# Altium PCB OFP_MCM_v1.6.PcbDoc (part 8 of 8)
Units mm, origin at the board's own origin, x right, y up, seen from the top; angles counter-clockwise.
Board outline 110 x 120 mm, 4 copper layers (Top Layer, Layer 1, Layer 2, Bottom Layer), stack 1.576 mm thick; 381 components, 285 nets, 1332 pads, 552 vias.
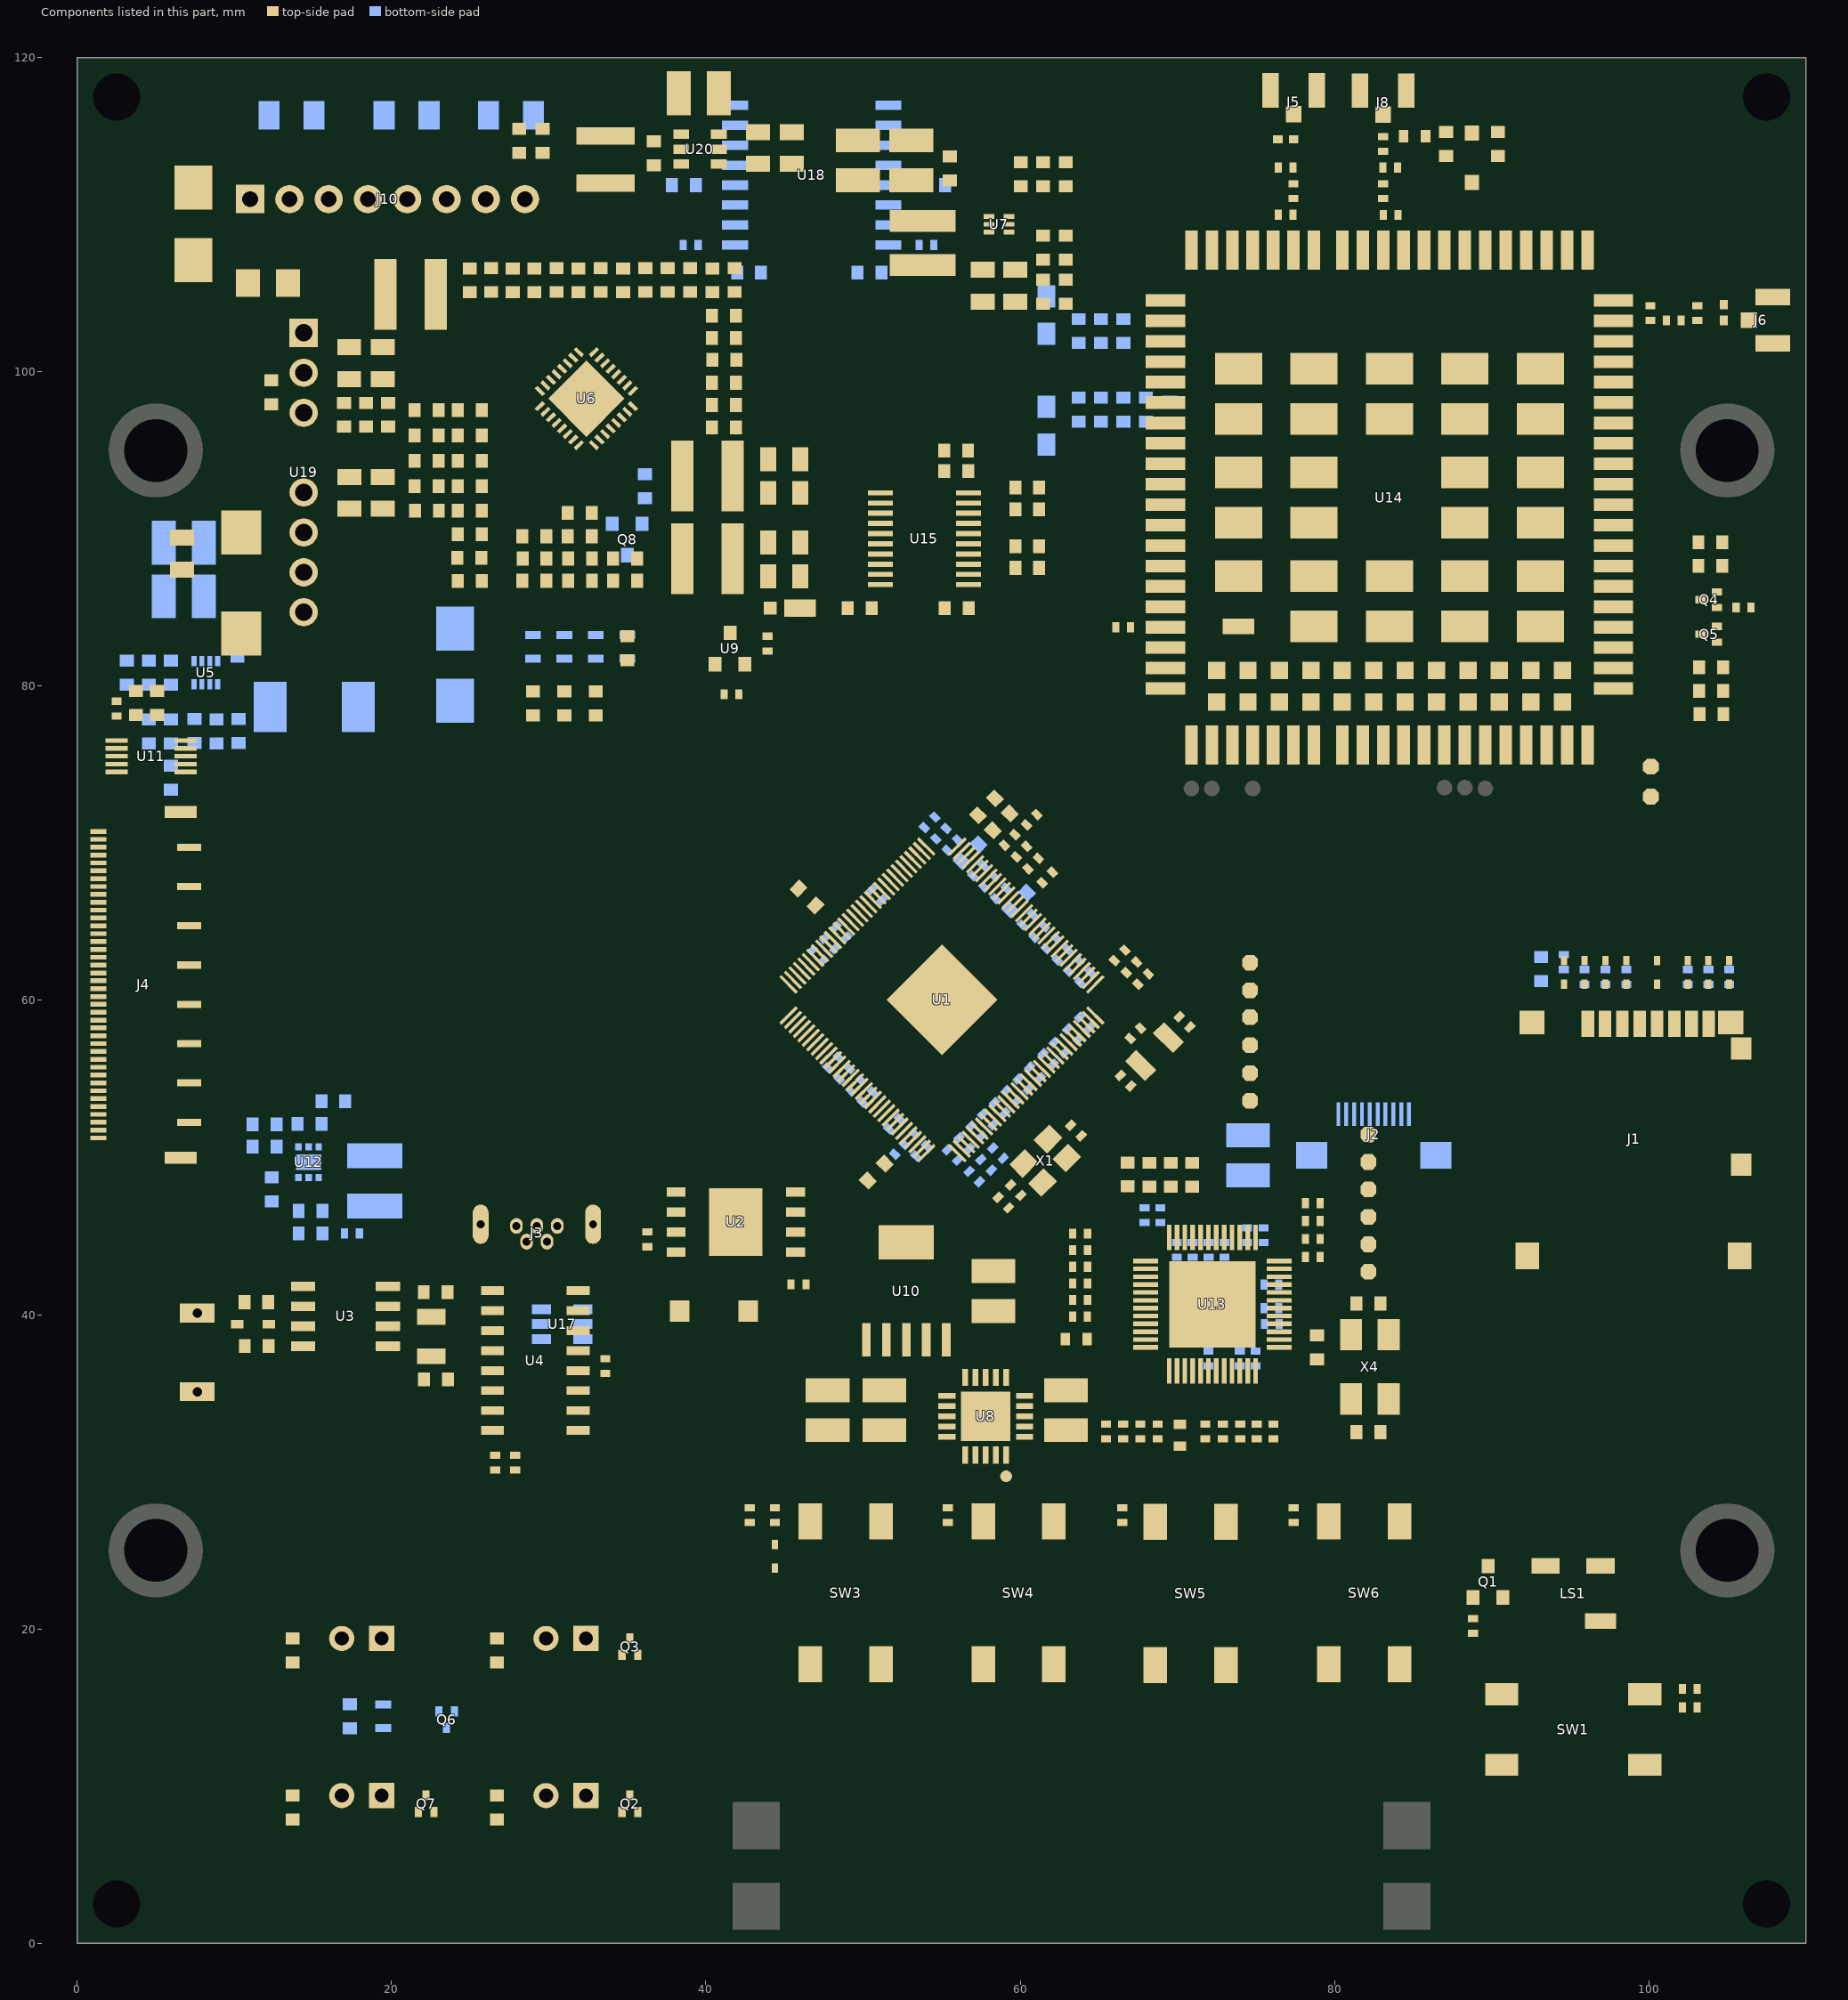
[diagram p7: the components of this part, seen from the top]

## Polygon pours and split planes (outlines as drawn)
+3.8V on Top Layer "NONET_L-01_P-001" (solid, pour order 37): 56.353,105.487 56.717,105.123 63.548,105.123 63.906,104.765 63.906,102.697 64.253,102.35 70.694,102.35 71.092,101.952 71.092,98.05 70.692,97.65 51.699,97.65 51.699,107.506 56.353,107.506
GND on Top Layer "NONET_L-01_P-001" (solid, remove dead copper, pour order 45): 0,120 110,120 110,0 0,0 0,120
VCC-DRAM on Top Layer "NONET_L-01_P-001" (solid, pour order 19): 57.035,56.251 58.096,56.251 59.833,54.514 60.571,53.776 58.449,51.655 57.389,52.715 56.532,52.715 ccw(c56.532,50.175) 54.736,51.971 51.612,48.848 50.622,49.838
+5V on Top Layer "NONET_L-01_P-001" (solid, pour order 4): 33.581,96.533 35.508,94.606 35.599,94.606 35.786,94.793 35.786,95.536 34.185,97.137
GND on Layer 1 "NONET_L-01_P-001" (solid, pour order 36): 0,120 110,120 110,0 0,0 0,120
+3.3V on Layer 2 "NONET_L-01_P-001" (solid, pour order 32): 25.654,6.58 ccw(c26.646,6.58) 26.646,5.588 ccw(c26.646,6.58) 27.639,6.58 27.639,26.27 88.628,26.27 91.77,29.382 91.77,68.292 109.498,68.292 109.498,0 0,0 0,92.091 58.535,92.091 59.487,91.139 59.487,82.674 58.423,81.61 38.608,81.61 37.846,80.848 37.846,50.614 40.15,48.311 47.29,48.311 47.574,48.026 47.574,45.801 47.31,45.537 37.902,45.537 34.078,49.361 34.078,77.758 33.195,78.641 28.857,78.641 27.813,77.598 27.813,63.632 18.398,54.217 18.398,33.099 25.654,25.842
+5V on Layer 2 "NONET_L-01_P-001" (solid, pour order 13): 81.976,49.718 82.405,49.718 83.439,48.683 83.439,31.242 82.55,30.353 51.943,30.353 51.211,31.085 51.211,39.128 50.588,39.751 45.466,39.751 44.958,39.243 44.958,27.184 88.017,27.184 90.691,29.858 90.691,68.292 70.5,88.482 70.5,119.634 0.381,119.634 0.381,92.784 11.437,92.784 14.363,95.711 14.363,108.099 14.005,108.458 9.779,108.458 9.144,109.093 9.144,112.004 9.789,112.649 58.801,112.649 60.198,111.252 60.198,75.026 71.374,63.85 71.374,50.458 72.114,49.718
GND on Layer 2 "NONET_L-01_P-001" (solid, pour order 52): 53.742,77.082 cw(c53.742,76.51) 54.313,76.51 54.313,71.309 49.116,66.112 48.315,66.112 47.054,67.373 46.003,67.373 42.316,63.687 42.316,59.913 48.376,53.853 47.361,52.838 50.147,50.052 51.073,50.052 51.429,49.695 51.429,47.986 52.145,47.271 59.517,47.271 61.257,49.011 63.486,49.011 63.906,48.59 63.899,48.583 63.899,34.994 63.365,34.459 60.138,34.459 59.733,34.055 59.733,31.613 59.108,30.988 52.422,30.988 51.852,31.558 51.852,39.715 51.105,40.462 45.14,40.462 44.044,39.366 44.044,28.956 28.575,28.956 22.633,34.898 22.633,52.361 29.809,59.538 31.775,59.538 31.775,48.771 36.985,43.561 58.518,43.561 ccw(c58.518,44.373) 59.329,44.373 59.329,44.619 ccw(c58.411,44.619) 58.411,45.537 48.402,45.537 48.1,45.839 48.1,48.143 47.343,48.9 40.884,48.9 38.718,51.067 38.718,76.557 39.243,77.082
VCC-IO on Layer 2 "NONET_L-01_P-001" (solid, pour order 43): 58.248,63.493 60.34,65.584 60.771,65.584 63.883,62.471 63.883,62.078 55.86,54.055 55.86,51.487 54.869,50.496 50.362,50.496 48.159,52.698 48.159,52.89 48.784,53.515 48.969,53.515 50.757,51.727 54.313,51.727 54.643,52.057 54.643,54.928 62.141,62.425 62.141,62.782 61.349,63.574 60.757,63.574 57.59,60.406 57.012,60.406 50.984,66.434 50.984,67.227 55.852,72.095 55.984,72.095 57.406,70.673 57.406,70.322 54.313,67.229 54.313,66.883 57.704,63.493
GND on Layer 2 "NONET_L-01_P-001" (solid, pour order 50): 110,120 71.679,120 71.679,88.82 91.303,69.195 110,69.195
GND on Layer 2 "NONET_L-01_P-001" (solid, pour order 51): 59.487,93.683 58.588,92.784 38.22,92.784 37.552,93.452 37.552,109.336 36.788,110.1 27.604,110.1 27.604,111.989 58.344,111.989 59.487,110.845
+1.2V on Layer 2 "NONET_L-01_P-001" (solid, pour order 49): 16.9,108.718 17.402,109.22 36.214,109.22 36.816,108.618 36.816,102.682 36.215,102.081 17.407,102.081 16.9,102.588
VDD-SYS on Layer 2 "NONET_L-01_P-001" (solid, pour order 48): 52.263,50.038 51.953,49.728 51.953,48.08 52.282,47.752 59.208,47.752 59.841,48.385 59.841,52.873 62.112,55.143 62.112,55.595 60.216,57.491 59.842,57.491 56.284,53.934 56.284,51.311 55.011,50.038
AVCC on Layer 2 "NONET_L-01_P-001" (solid, pour order 47): 62.895,54.894 62.895,55.414 60.672,57.637 60.672,58.049 64.275,61.652 64.275,62.636 63.26,63.651 60.922,65.989 60.196,65.989 58.088,63.881 57.865,63.881 57.485,64.261 57.485,64.469 60.762,67.747 61.412,67.747 66.953,62.206 66.953,59.778 66.953,53.291 63.17,49.508 62.435,49.508 60.235,51.709 60.235,52.234
VDD-SYS on Layer 2 "NONET_L-01_P-001" (solid, pour order 44): 46.129,62.371 49.934,66.177 50.629,66.177 56.713,60.092 57.856,60.092 60.918,63.154 61.217,63.154 61.655,62.716 61.655,62.506 54.243,55.093 54.243,53.002 54.101,52.861 53.515,52.861 53.377,52.999 53.377,54.428 46.129,61.676
VCC-HP on Layer 2 "NONET_L-01_P-001" (solid, pour order 46): 67.35,60.129 67.35,53.747 67.838,53.258 69.923,53.258 70.425,53.76 70.425,63.403 62.343,71.485 61.485,71.485 56.116,66.116 56.116,65.625 56.85,64.891 57.331,64.891 60.602,68.161 61.553,68.161 67.35,62.365
VDD-CPU on Layer 2 "NONET_L-01_P-001" (solid, pour order 42): 46.811,66.964 48.26,65.515 48.26,65.118 45.7,62.558 45.7,61.475 51.816,55.359 51.816,54.846 50.215,53.245 49.817,53.245 42.863,60.199 42.863,63.518 46.308,66.964
+5V on Layer 2 "NONET_L-01_P-001" (solid, pour order 27): 10.668,108.107 11.019,108.458 14.005,108.458 14.4,108.063 14.4,101.721 14.775,101.346 36.216,101.346 36.816,100.747 36.816,93.406 36.194,92.784 11.437,92.784 10.668,93.553
VDD33 on Layer 2 "NONET_L-01_P-001" (solid, pour order 33): 64.389,48.611 64.75,48.971 82.063,48.971 82.639,48.395 82.639,31.839 81.788,30.988 68.04,30.988 67.386,31.642 67.386,35.765 66.956,36.195 64.833,36.195 64.389,36.639 64.389,38.5 64.805,38.917 72.562,38.917 73.22,38.259 73.22,33.49 73.599,33.111 75.418,33.111 75.828,33.521 75.828,37.082 76.203,37.456 78.953,37.456 79.429,37.932 79.429,42.982 79.033,43.378 77.569,43.378 77.137,43.81 77.137,45.329 76.543,45.923 67.502,45.923 67.061,45.481 67.061,44.168 66.625,43.733 64.662,43.733 64.389,44.006
VDD11 on Layer 2 "NONET_L-01_P-001" (solid, pour order 41): 64.389,43.02 64.684,43.332 66.782,43.332 67.455,44.005 67.455,45.319 67.66,45.525 76.37,45.525 76.74,45.155 76.74,43.458 77.216,42.982 78.782,42.982 79.036,42.729 79.036,38.088 78.796,37.849 76.045,37.849 75.439,37.243 75.439,33.694 75.247,33.502 73.788,33.502 73.609,33.681 73.609,38.424 72.621,39.412 64.749,39.412 64.389,39.772
NetL6_2 on Bottom Layer "NONET_L-01_P-001" (solid, pour order 38): 20.676,49.223 15.869,49.223 15.869,50.464 15.177,50.464 15.177,51.23 20.676,51.23
+3.3V on Bottom Layer "NONET_L-01_P-001" (solid, pour order 53): 47.698,56.105 46.523,54.929 ccw(c48.098,53.354) 45.87,53.354 45.87,41.81 ccw(c46.66,41.81) 46.66,41.021 50.564,41.021 ccw(c50.564,42.198) 51.741,42.198 51.741,49.493 ccw(c51.182,49.493) 51.182,50.052 50.574,50.052 ccw(c50.574,49.414) 49.936,49.414 49.936,47.557 cw(c49.371,47.557) 49.371,46.991 47.704,46.991 cw(c47.704,47.628) 47.066,47.628 47.066,52.777 cw(c47.911,52.777) 47.314,53.374 48.871,54.932
GND on Bottom Layer "NONET_L-01_P-001" (solid, remove dead copper, pour order 5): 0,120 110,120 110,0 0,0 0,120
+5V on Bottom Layer "NONET_L-01_P-001" (solid, pour order 40): 70.189,50.504 69.875,50.818 69.875,53.916 70.112,54.153 80.099,54.153 80.374,53.878 80.374,51.756 80.083,51.464 76.804,51.464 75.844,50.504

## Other copper
Top Layer:
  rectangle net +5VUSB: 25.693,30.834 28.397,33.036
  rectangle net GND: 6.358,69.522 7.882,70.195
  rectangle net GND: 6.358,66.838 7.882,67.479
  rectangle net GND: 6.358,54.369 7.882,54.979
  rectangle net GND: 6.358,57.021 7.882,57.699
  region net +3.3V: 11.018,39.134 11.018,39.654 9.783,39.654 9.783,39.134
  rectangle net 3V3-I: 40.054,111.456 46.539,113.523
  rectangle net 3V3-I: 41.995,111.456 46.539,114.249
  rectangle net 3V3-I: 31.765,111.456 46.228,112.556
  rectangle net GND-IN: 37.514,114.823 39.038,119.126
  rectangle net NetC151_2: 31.765,113.873 37.141,115.556
  rectangle net NetC151_1: 36.404,112.776 38.924,113.538
  rectangle net NetC151_2: 31.765,113.873 38.924,114.473
  rectangle net 3V3-I: 40.054,112.923 45.466,113.523
  rectangle net VIN+: 40.054,113.873 41.578,117.729
  rectangle net GND: 40.182,79.167 41.391,81.861
  rectangle net VLED-: 0.837,50.317 3.618,51.402
  rectangle net VLED-: 0.837,50.317 1.853,51.402
  rectangle net GND: 40.215,41.415 43.615,48.05
  rectangle net GND: 71.461,31.879 72.143,32.336
  region net GND: 33.751,95.712 33.927,95.889 32.554,97.262 32.378,97.085
  region net GND: 34.811,96.773 34.988,96.949 33.615,98.322 33.438,98.146
  region net GND: 34.281,100.358 34.104,100.535 32.731,99.162 32.908,98.985
  region net GND: 31.049,100.888 30.873,100.711 32.245,99.338 32.422,99.515
  rectangle net NetR63_2: 58.952,109.741 61.9,112.19
  rectangle net 1.1V-HUB: 61.519,31.892 64.313,33.924
  rectangle net +3.3V: 41.132,82.941 44.249,83.861
  rectangle net +3.0V: 41.873,78.138 42.902,81.861
  rectangle net +3.8V: 68,97.65 70.5,102.35
  region net USB-D_N: 61.172,64.63 62.197,65.655 62.056,65.797 61.03,64.771
  region net USB-D_P: 60.889,64.913 61.914,65.938 61.773,66.079 60.747,65.054
  rectangle net 1.1V-HUB: 58.926,35.464 60.82,36.551
  rectangle net 1.1V-HUB: 61.519,31.892 65.777,32.336
  rectangle net 1.1V-HUB: 59.733,33.33 64.313,33.924
  rectangle net 1.1V-HUB: 59.733,33.357 60.82,36.551
  rectangle net +3.8V: 51.699,103.963 63.341,105.123
  rectangle net +3.8V: 51.699,103.963 56.353,107.506
  rectangle net NetR58_1: 58.952,108.282 61.9,109.041
  region net VCC-DRAM: 59.098,55.273 58.93,55.105 60.414,53.62 60.583,53.788
  region net VCC-DRAM: 57.098,53.313 56.93,53.144 58.434,51.64 58.603,51.808
  region net AGND: 59.806,66.634 59.638,66.802 58.788,65.952 58.956,65.784
  region net AGND: 62.193,67.692 63.196,68.695 60.281,71.61 59.279,70.607
  region net VDD-CPU: 45.85,63.688 47.419,62.12 47.844,62.544 46.275,64.113
  region net VDD-CPU: 47.608,64.759 48.249,65.4 47.254,66.395 46.613,65.754
  region net VDD-CPU: 46.38,65.987 48.833,63.534 49.258,63.958 46.804,66.412
  region net VCC-DRAM: 51.612,48.848 54.066,51.301 53.076,52.291 50.622,49.838
  region net VCC-DRAM: 58.025,51.231 56.964,52.291 55.328,50.655 56.388,49.594
  region net VCC-DRAM: 57.848,51.383 57.526,51.705 55.422,49.601 55.744,49.279
  rectangle net VDD11: 71.461,32.819 72.143,33.276
  rectangle net NetR110_2: 102.833,77.787 103.607,80.145
  rectangle net EC_RST: 102.833,80.756 103.624,84.085
  rectangle net EC_PWR: 102.781,84.722 103.624,89.601
  rectangle net VDD33: 75.682,43.267 78.372,43.567
  rectangle net +5V: 57.415,109.741 58.602,110.293
  region net +5V: 34.185,97.137 33.581,96.533 35.153,94.961 35.757,95.565
  region net NetC65_2: 33.125,96.076 32.86,95.812 34.523,94.149 34.788,94.413
  region net NetC72_2: 34.892,97.844 34.628,97.58 36.289,95.918 36.554,96.182
  region net NetC54_2: 31.721,100.57 31.898,100.747 30.525,102.12 30.348,101.943
  region net +3.3V: 2.118,78.549 ccw(c2.118,78.232) 1.801,78.232 1.801,76.395 5.166,76.395 ccw(c5.166,76.746) 5.518,76.746 5.518,78.549
  region net 12V: 14.406,90.685 cw(c14.406,89.785) 15.306,89.785 cw(c14.406,89.785) 14.406,88.885 5.912,88.885 5.912,90.685
  region net VIN+: 14.4,111.9 14.4,108.853 cw(c14.005,108.853) 14.005,108.458 11.9,108.458 11.9,101.575 ccw(c12.644,101.574) 12.644,100.83 14.406,100.83 cw(c14.395,99.919) 15.306,99.945 cw(c14.406,99.945) 14.406,99.045 4.928,99.045 4.928,107.315 cw(c6.137,107.315) 6.137,108.525 9.155,108.525 ccw(c9.155,109.474) 10.104,109.474 10.104,111.9
  region net +EXT: 104.191,81.645 ccw(c104.191,81.477) 104.024,81.477 104.024,79.496 ccw(c104.264,79.496) 104.264,79.255 105.437,79.255 cw(c105.437,78.712) 105.98,78.712 105.98,78.676 106.487,78.676 106.487,81.071 ccw(c105.913,81.071) 105.913,81.645
  region net 3.3V-HUB: 53.381,36.643 ccw(c53.381,37.008) 53.746,37.008 53.746,40.589 53.746,40.629 53.762,40.708 53.793,40.782 53.837,40.848 53.894,40.905 53.96,40.949 54.034,40.98 54.113,40.996 54.153,40.996 59.868,40.996 59.898,40.996 59.955,40.984 60.008,40.962 60.057,40.93 60.098,40.889 60.13,40.84 60.152,40.787 60.164,40.73 60.164,40.701 60.164,39.343 60.165,39.315 60.176,39.259 60.198,39.207 60.229,39.16 60.269,39.12 60.316,39.089 60.368,39.067 60.424,39.056 60.452,39.055 62.964,39.055 62.984,39.055 63.023,39.047 63.061,39.031 63.094,39.009 63.123,38.98 63.145,38.947 63.161,38.91 63.168,38.87 63.168,38.85 63.168,37.541 63.168,37.52 63.16,37.479 63.144,37.44 63.121,37.406 63.091,37.376 63.056,37.353 63.018,37.337 62.977,37.329 62.956,37.329 56.976,37.329 56.948,37.327 56.893,37.316 56.841,37.295 56.795,37.264 56.755,37.224 56.724,37.177 56.702,37.126 56.692,37.071 56.69,37.043 56.69,35.464 56.233,35.464 56.199,35.462 56.131,35.449 56.068,35.422 56.011,35.384 55.995,35.368 55.979,35.368 55.979,35.352 55.962,35.336 55.924,35.279 55.898,35.215 55.885,35.148 55.883,35.114 55.883,33.357 54.559,33.357 54.539,33.356 54.5,33.348 54.463,33.333 54.43,33.311 54.402,33.282 54.38,33.249 54.365,33.213 54.357,33.173 54.356,33.154 54.356,32.654 54.357,32.631 54.366,32.586 54.384,32.544 54.409,32.506 54.441,32.474 54.479,32.448 54.521,32.431 54.566,32.422 54.589,32.421 55.883,32.421 55.883,31.892 55.884,31.864 55.895,31.811 55.916,31.761 55.946,31.715 55.985,31.677 56.03,31.646 56.08,31.626 56.134,31.615 56.161,31.614 56.69,31.614 56.69,30.527 53.416,30.527 53.384,30.527 53.32,30.539 53.26,30.564 53.206,30.6 53.16,30.646 53.124,30.7 53.099,30.761 53.086,30.824 53.086,30.857 53.086,34.007 53.084,34.048 53.068,34.13 53.036,34.207 52.99,34.276 52.931,34.335 52.861,34.382 52.784,34.413 52.703,34.43 52.661,34.432 49.962,34.432 49.962,36.643
  pour cut-out: 67.746,93.078 67.746,93.332 55.757,93.332 55.757,93.078
  pour cut-out: 16.554,92.041 16.554,90.685 0.388,90.685 0.388,99.09 15.39,99.09 15.39,100.876 16.554,100.876
  pour cut-out: 21.514,100.806 21.514,108.203 15.558,108.203 15.558,100.806
  pour cut-out: 9.175,54.191 9.417,54.191 9.417,67.75 9.175,67.75
  pour cut-out: 24.207,43.237 24.207,36.321 23.217,36.321 23.217,34.616 18.741,34.616 18.741,41.275 20.545,41.275 20.545,43.237
  pour cut-out: 6.286,37.303 15.399,37.303 15.399,40.35 6.286,40.35
  pour cut-out: 30.888,33.346 32.858,33.346 32.858,42.058 30.888,42.058
  pour cut-out: 25.439,33.346 27.408,33.346 27.408,42.058 25.439,42.058
  pour cut-out: 35.388,44.782 37.261,44.782 37.261,44.853 35.388,44.853
  pour cut-out: 47.744,111.428 48.278,111.428 48.278,119.612 47.744,119.612
  pour cut-out: 24.658,94.911 24.851,94.911 24.851,95.369 24.658,95.369
  region net GND-IN: 117 vertices and 6 holes, not listed, extent 0.388,99.045 46.539,119.612
  region net GND-IN: 12.816,108.187 15.248,108.187 15.287,108.183 15.306,108.013 15.306,100.91 15.142,100.842 15.115,100.869 14.852,101.021 14.558,101.099 14.255,101.099 14.216,101.089 12.651,101.089 12.603,101.091 12.504,101.111 12.416,101.147 12.337,101.2 12.27,101.267 12.217,101.346 12.181,101.434 12.161,101.533 12.159,101.581 12.159,107.461 12.169,107.54 12.165,107.546 12.213,107.79 12.355,108.002 12.566,108.143 12.798,108.189
  region net +5V: 62.951,117.087 62.981,117.067 63.314,116.733 63.334,116.703 63.341,116.668 63.341,112.99 63.335,112.957 63.328,112.952 62.452,112.952 62.452,114.693 62.149,114.996 58.962,114.996 58.696,114.73 58.696,112.206 58.693,112.19 58.693,109.741 58.6,109.741 57.307,109.741 57.307,111.428 51.275,111.428 51.133,111.428 48.278,111.428 48.278,112.952 54.388,112.952 54.477,112.952 56.436,112.952 56.436,113.254 56.436,116.551 56.443,116.586 56.463,116.616 56.914,117.067 56.944,117.087 56.979,117.094 62.915,117.094
  region net +1.2V: 20.454,107.4 20.454,101.065 16.554,101.065 16.554,107.4
  region net +5V: 16.533,92.3 16.533,96.89 20.739,96.89 20.739,100.989 22.31,100.989 22.316,100.988 30.242,100.988 31.191,100.04 30.663,99.512 29.989,100.187 29.763,100.413 26.485,100.413 26.379,100.306 24.487,98.414 22.154,98.414 22.154,90.73 21.108,90.73 21.108,92.027 20.834,92.3
  pour cut-out: 44.395,108.204 27.044,108.204 27.044,105.433 44.395,105.433
  pour cut-out: 48.278,111.428 47.744,111.428 47.744,108.204 44.399,108.204 44.399,107.506 48.278,107.506
  pour cut-out: 99.262,81.804 99.262,83.096 98.986,83.096 98.986,81.804
  pour cut-out: 66.234,32.473 76.685,32.473 76.685,32.817 66.234,32.817
  pour cut-out: 82.915,51.841 82.792,51.841 82.792,44.101 82.915,44.101
  pour cut-out: 82.411,37.098 82.548,37.098 82.548,41.969 82.411,41.969
  pour cut-out: 21.986,92.184 21.986,92.019 22.444,92.019 22.444,92.184
  pour cut-out: 70.347,48.774 70.347,51.564 70.248,51.564 70.248,48.774
  pour cut-out: 94.144,59.345 94.144,61.578 96.566,61.578 96.566,65.131 104.452,65.131 104.452,59.345
  region net +5V: 52.008,39.439 52.081,39.365 52.121,39.27 52.121,39.218 52.121,37.368 52.121,37.296 52.066,37.164 51.965,37.063 51.832,37.008 49.672,37.008 49.619,37.003 49.522,36.962 49.448,36.888 49.408,36.791 49.403,36.739 49.403,34.686 49.403,34.635 49.364,34.542 49.293,34.47 49.2,34.432 46.359,34.432 46.206,34.495 46.088,34.613 46.025,34.766 46.025,34.849 46.025,39.041 46.025,39.128 46.091,39.289 46.214,39.412 46.375,39.479 51.912,39.479
  region net NetC54_2: 24.276,107.4 24.276,105.444 25.421,105.444 25.428,105.437 25.428,102.632 30.013,102.632 31.223,101.421 31.221,101.418 31.895,100.744 31.727,100.576 31.233,101.071 31.211,101.085 31.049,101.247 31.047,101.244 31.041,101.25 30.707,100.917 30.377,101.247 21.514,101.247 21.514,107.4
  region net +3.3V: 44.494,90.855 44.494,83.179 44.13,82.814 41,82.814 41,90.855
  region net +1.8V: 44.475,95.193 44.475,91.134 41,91.134 41,95.634 44.034,95.634
  region net NetC65_2: 33.567,95.529 33.589,95.515 33.751,95.353 33.799,95.401 33.803,95.398 34.073,95.668 35.774,93.968 35.774,91.601 36.519,90.855 39.2,90.855 39.2,85.51 39.034,85.344 33.797,85.344 33.595,85.546 33.595,87.022 33.722,87.149 34.713,87.149 34.865,86.998 34.865,86.006 34.981,85.89 36.153,85.89 36.262,85.999 36.262,86.006 36.262,87.403 36.262,88.842 36.008,89.096 34.865,89.096 34.463,89.499 34.463,94.293 33.577,95.179 33.579,95.182 32.905,95.856 33.072,96.024
  region net NetC72_2: 35.518,97.121 35.521,97.123 35.73,96.914 38.882,96.914 38.885,96.917 40.892,96.917 40.892,96.028 39.37,96.028 39.184,95.858 39.184,91.134 36.643,91.134 36.043,91.734 36.043,96.248 35.344,96.947 35.347,96.949 35.185,97.111 35.171,97.133 34.676,97.628 34.844,97.795
Layer 1:
  pour cut-out: 15.917,95.104 12.884,95.104 12.884,104.595 15.917,104.595
  pour cut-out: 9.249,109.489 9.249,112.522 29.972,112.522 29.972,109.489
Bottom Layer:
  rectangle net +5V: 13.582,43.485 20.17,44.425
  region net 12V: 8.276,83.995 8.276,81.257 8.596,81.257 8.596,83.995
  rectangle net NetR82_1: 15.157,51.688 15.919,54.025
  rectangle net +5V: 17.729,43.485 20.168,47.714
  rectangle net NetL6_2: 15.995,49.314 20.168,50.914
  rectangle net NetL6_2: 15.177,50.464 20.168,50.914
  rectangle net GND: 15.614,44.859 17.247,45.494
  region net NetR82_1: 15.995,46.162 15.995,48.964 15.106,48.964 15.106,46.162
  region net +5V: 14.927,47.435 14.927,48.964 14.46,48.964 14.46,47.435
  region net +5V: 14.925,43.485 14.925,48.294 13.582,48.294 13.582,43.485
  region net +5V: 14.927,44.731 14.927,48.964 14.527,48.964 14.527,44.731
  region net VLED-: 11.535,50.26 11.535,52.565 10.773,52.565 10.773,50.26
  rectangle net GND: 84.124,51.308 84.874,53.508
  rectangle net GND: 63.274,96.457 67.017,97.219
  rectangle net GND: 63.274,102.981 67.017,103.743
  rectangle net +3.8V: 61.099,97.498 68.444,102.6
  rectangle net VDD33: 76.228,39.099 76.705,40.734
  rectangle net +USIM: 81.574,52.008 82.429,54.527
  rectangle net +3.3V: 92.712,62.387 94.915,63.15
  region net 12V: 10.643,88.125 cw(c11.403,88.125) 11.403,88.885 14.406,88.885 ccw(c14.406,89.785) 15.306,89.785 ccw(c14.406,89.785) 14.406,90.685 7.293,90.685 7.293,83.008 7.679,83.008 cw(c7.68,82.412) 8.276,82.411 8.276,81.257 8.596,81.257 8.596,81.906 cw(c9.317,81.906) 9.317,82.627 10.643,82.627
  region net +1.8V: 42.4,92.277 42.4,94.667 cw(c42.729,94.667) 42.729,94.996 44.734,94.996 cw(c44.734,94.629) 45.101,94.629 45.101,91.208 44.213,91.208 ccw(c43.508,91.243) 43.543,91.948 42.729,91.948 cw(c42.729,92.277)
  pour cut-out: 94.023,62.451 94.023,59.495 106.916,59.495 106.916,62.451
  pour cut-out: 45.364,119.6 45.364,105.626 49.276,105.626 49.276,119.6
  pour cut-out: 7.022,81.232 3.861,81.232 3.861,80.476 7.022,80.476
  pour cut-out: 22.077,11.083 22.077,13.242 21.956,13.242 21.956,11.083
  pour cut-out: 39.948,78.166 39.948,80.325 39.878,80.325 39.878,78.166
  pour cut-out: 43.18,98.933 43.18,101.092 42.421,101.092 42.421,98.933
  pour cut-out: 15.851,94.512 15.851,100.702 15.602,100.702 15.602,94.512
  region net GND-IN: 34.628,114.319 34.827,114.165 35.06,114.069 35.309,114.036 35.309,114.037 40.752,114.037 40.782,113.872 40.782,113.722 40.752,113.544 34.675,113.544 34.675,113.545 34.585,113.563 34.508,113.614 34.457,113.69 34.439,113.78 34.439,114.273 34.616,114.333
  region net GND-IN: 275 vertices and 8 holes, not listed, extent 0.388,94.771 45.364,119.612
  region net 3.3V-HUB: 73.32,43.179 73.296,43.148 73.187,42.885 73.15,42.603 73.152,42.603 73.152,39.96 73.15,39.96 73.15,39.959 73.048,39.917 72.641,39.917 72.543,40.065 72.543,40.286 72.458,40.489 72.303,40.645 72.099,40.729 71.879,40.729 71.675,40.645 71.594,40.564 71.478,40.509 71.362,40.564 71.28,40.645 71.077,40.729 70.856,40.729 70.653,40.645 70.572,40.564 70.455,40.509 70.339,40.564 70.258,40.645 70.055,40.729 69.834,40.729 69.631,40.645 69.475,40.489 69.39,40.286 69.39,40.065 69.292,39.917 66.682,39.917 66.608,39.991 66.404,40.076 66.184,40.076 65.98,39.991 65.906,39.917 65.573,39.917 65.534,39.956 65.331,40.04 65.11,40.04 64.907,39.956 64.751,39.8 64.749,39.795 64.679,39.725 64.614,39.57 64.606,39.486 64.606,37.403 64.606,37.35 64.565,37.251 64.49,37.176 64.392,37.135 64.338,37.135 61.141,37.135 61.069,37.164 61.015,37.219 60.985,37.29 60.985,41.3 60.985,41.427 61.082,41.66 61.261,41.839 61.494,41.935 61.62,41.935 64.747,41.935 64.751,41.926 64.907,41.77 65.11,41.686 65.331,41.686 65.534,41.77 65.69,41.926 65.694,41.935 69.34,41.935 69.4,41.941 69.509,41.987 69.593,42.071 69.639,42.18 69.645,42.24 69.645,43.876 70.404,43.876 70.404,43.11 70.393,43.083 70.393,42.863 70.404,42.836 70.404,42.677 70.407,42.648 70.429,42.595 70.47,42.554 70.473,42.552 70.525,42.409 70.525,42.353 70.477,42.304 70.393,42.101 70.393,41.88 70.477,41.677 70.633,41.521 70.837,41.437 71.057,41.437 71.261,41.521 71.342,41.602 71.458,41.657 71.574,41.602 71.655,41.521 71.859,41.437 72.079,41.437 72.283,41.521 72.439,41.677 72.523,41.88 72.523,42.101 72.439,42.304 72.39,42.354 72.389,42.363 72.4,42.426 72.449,42.545 72.481,42.558 72.53,42.607 72.557,42.672 72.56,42.706 72.56,43.876 73.32,43.876 hole: 65.331,41.471 65.11,41.471 64.907,41.386 64.751,41.231 64.666,41.027 64.666,40.806 64.751,40.603 64.907,40.447 65.11,40.363 65.331,40.363 65.534,40.447 65.69,40.603 65.774,40.806 65.774,41.027 65.69,41.231 65.534,41.386
  region net +5V: 19.989,96.343 22.211,96.343 22.211,81.483 24.226,81.483 24.326,81.483 24.521,81.444 24.705,81.368 24.871,81.257 25.012,81.117 25.123,80.951 25.199,80.767 25.225,80.635 25.238,80.472 25.238,77.885 25.238,76.962 22.925,76.962 22.925,76.963 22.653,76.927 22.4,76.823 22.183,76.656 22.016,76.439 21.94,76.254 21.747,76.254 21.704,76.358 21.548,76.514 21.345,76.599 21.124,76.599 21.103,76.668 21.103,76.691 21.018,76.895 20.862,77.051 20.659,77.135 20.438,77.135 20.235,77.051 20.079,76.895 19.995,76.691 19.995,76.471 20.079,76.267 20.199,76.147 20.199,72.136 17.038,72.136 16.893,72.281 16.689,72.365 16.469,72.365 16.415,72.343 16.238,72.444 16.153,72.648 15.997,72.804 15.794,72.888 15.573,72.888 15.37,72.804 15.316,72.75 15.138,72.823 15.138,73.569 15.258,73.689 15.342,73.893 15.342,74.113 15.258,74.317 15.102,74.473 14.899,74.557 14.678,74.557 14.625,74.535 14.447,74.638 14.363,74.841 14.207,74.997 14.003,75.082 13.783,75.082 13.579,74.997 13.424,74.841 13.339,74.638 13.339,74.417 13.424,74.214 13.544,74.094 13.544,72.136 8.603,72.136 7.517,72.136 3.81,72.136 3.682,72.13 3.43,72.08 3.193,71.981 2.979,71.839 2.798,71.657 2.655,71.444 2.557,71.207 2.507,70.955 2.501,70.827 2.501,65.92 2.385,65.92 2.181,65.836 2.026,65.68 1.941,65.476 1.941,65.256 2.026,65.052 2.146,64.932 2.146,59.608 2.144,59.608 2.177,59.361 2.272,59.13 2.424,58.933 2.501,58.874 2.501,47.283 2.507,47.162 2.554,46.924 2.647,46.7 2.782,46.498 2.953,46.326 3.155,46.192 3.379,46.099 3.617,46.052 3.738,46.046 13.835,46.046 14.037,45.962 14.193,45.806 14.277,45.603 14.277,44.111 14.25,43.977 14.198,43.851 14.122,43.737 14.025,43.64 13.911,43.564 13.785,43.512 13.65,43.485 0.388,43.485 0.388,74.168 11.059,74.168 11.059,76.581 16.469,76.581 16.469,96.343 18.601,96.343
  region net NetC53_2: 8.776,79.787 9.82,79.787 9.82,77.091 13.337,77.091 13.337,80.857 8.776,80.857
  pour cut-out: 95.221,73.53 95.221,73.446 91.095,73.446 91.095,73.53
  pour cut-out: 76.07,40.086 75.969,40.086 75.969,42.03 76.07,42.03
  pour cut-out: 66.044,55.426 66.044,55.576 67.988,55.576 67.988,55.426
Multi-Layer:
  pour cut-out: 107.5,0 cw(c107.5,2.5) 105,2.5 cw(c107.5,2.5) 107.5,5 cw(c107.5,2.5) 110,2.5 cw(c107.5,2.5)
  pour cut-out: 2.5,0 cw(c2.5,2.5) 0,2.5 cw(c2.5,2.5) 2.5,5 cw(c2.5,2.5) 5,2.5 cw(c2.5,2.5)
  pour cut-out: 2.5,115 cw(c2.5,117.5) 0,117.5 cw(c2.5,117.5) 2.5,120 cw(c2.5,117.5) 5,117.5 cw(c2.5,117.5)
  pour cut-out: 107.5,115 cw(c107.5,117.5) 105,117.5 cw(c107.5,117.5) 107.5,120 cw(c107.5,117.5) 110,117.5 cw(c107.5,117.5)
  pour cut-out: 5,91.5 cw(c5,95) 1.5,95 cw(c5,95) 5,98.5 cw(c5,95) 8.5,95 cw(c5,95)
  pour cut-out: 5,21.5 cw(c5,25) 1.5,25 cw(c5,25) 5,28.5 cw(c5,25) 8.5,25 cw(c5,25)
  pour cut-out: 105,21.5 cw(c105,25) 101.5,25 cw(c105,25) 105,28.5 cw(c105,25) 108.5,25 cw(c105,25)
  pour cut-out: 105,91.5 cw(c105,95) 101.5,95 cw(c105,95) 105,98.5 cw(c105,95) 108.5,95 cw(c105,95)

## Silkscreen, mask and mechanical layers (free items; w line width, h text height)
Top Overlay:
  drawing of 61 lines, arcs and shapes, not listed
  text "GNSS" at 86.215,117.064 h2.54
  text "MAIN" at 68.326,117.035 h2.54
  text "DIV" at 108.771,106.459 h2.54 r90
  text "5" at 25.947,99.032 h1.78
  text "4" at 34.385,90.586 h1.78
  text "5" at 28.015,83.744 h1.78
  text "4" at 50.081,80.165 h1.78
  text "VDD-SDIO" at 101.13,74.416 h1.27
  text "VDD-USIM" at 101.257,72.649 h1.27
  text "EPHY-TXP" at 75.655,61.912 h1.27
  text "EPHY-TXN" at 75.618,60.157 h1.27
  text "EPHY-RXP" at 75.63,58.443 h1.27
  text "EPHY-RXN" at 75.593,56.665 h1.27
  text "EPHY-SPD" at 75.655,54.887 h1.27
  text "EPHY-LNK" at 75.586,53.109 h1.27
  text "OFP_MSM_V1.6" at 18.936,51.054 h1.27
  text "PWR-CTL2" at 83.12,50.775 h1.27
  text "PWR-CTL1" at 83.12,49.028 h1.27
  text "RGB LCD" at 10.922,49 h2.54 r90
  text "PWR-CTL0" at 83.12,47.281 h1.27
  text "SMB-DAT" at 83.12,45.535 h1.27
  text "SMB-CLK" at 83.12,43.788 h1.27
  text "3" at 60.773,43.622 h1.78
  text "SMB-USZ" at 83.12,42.086 h1.27
  text "SD CARD" at 91.872,40.005 h2.54
  text "3" at 86.703,37.048 h1.78
  text "PWR" at 15.1,22.957 h2.54
  text "GSM" at 28.1,22.957 h2.54
  text "HOME" at 54.259,19.156 h2.54 r90
  text "NEXT" at 65.259,19.156 h2.54 r90
  text "BACK" at 76.217,19.116 h2.54 r90
  text "ENTER" at 87.259,18.713 h2.54 r90
  text "MES" at 15.1,12.957 h2.54
  text "NET" at 28.1,12.957 h2.54
  text "RESET" at 91.611,7.874 h2.54
Bottom Overlay:
  drawing of 38 lines, arcs and shapes, not listed
  text "STATUS" at 68.913,99.509 h1.52 r270
  text "3V8" at 28.437,84.424 h1.52 r270
  text "3V0" at 30.437,84.424 h1.52 r270
  text "1V8" at 32.437,84.424 h1.52 r270
  text "1V2" at 34.437,84.424 h1.52 r270
  text "1" at 74.616,46.539 h1.78
  text "USM EXT" at 87.392,44.529 h2.54
  text "DEBUG" at 32.902,41.324 h2.54
  text "1" at 84.607,40.021 h1.78
  text "OFP_MSM_V1.6" at 81.412,13.116 h1.27
Dimension:
  circle w0.013: c107.5,2.5 r1.7
Board Outline:
  lines w0.254: 0,0 0,120 110,120 110,0 0,0 ; 41.121,4.1 ccw(c41.38,4.1) 41.38,3.841 86.42,3.841 ccw(c86.42,4.1) 86.679,4.1 86.679,5.73 ccw(c86.42,5.73) 86.42,5.989 81.988,5.989 cw(c81.988,6.218) 81.759,6.218 81.759,7.95 ccw(c81.5,7.95) 81.5,8.209 62.154,8.209 cw(c62.154,8.454) 61.909,8.454 61.909,13.45 ccw(c61.65,13.45) 61.65,13.709 47.05,13.709 ccw(c47.05,13.45) 46.791,13.45 46.791,6.221 cw(c46.559,6.221) 46.559,5.989 41.38,5.989 ccw(c41.38,5.73) 41.121,5.73 41.121,4.1 ; 80.7,88.5 86.3,88.5 86.3,95.5 80.7,95.5 80.7,88.5
Fabrication:
  drawing of 295 lines, arcs and shapes, not listed
  text "Layer" at 195.849,172.974 h1.52
  text "Name" at 206.26,172.974 h1.52
  text "Material" at 229.876,172.974 h1.52
  text "Thickness" at 251.714,172.974 h1.52
  text "Constant" at 268.22,172.974 h1.52
  text "Board Layer Stack" at 282.694,172.974 h1.52
  text "Top Overlay" at 206.26,169.926 h1.52
  text "Top Solder" at 206.26,166.878 h1.52
  text "Solder Resist" at 229.876,166.878 h1.52
  text "0.010mm" at 251.714,166.878 h1.52
  text "3.5" at 268.22,166.878 h1.52
  text "1" at 195.849,163.83 h1.52
  text "Top Layer" at 206.26,163.83 h1.52
  text "0.035mm" at 251.714,163.83 h1.52
  text "Dielectric 2" at 206.26,160.782 h1.52
  text "PP-006" at 229.876,160.782 h1.52
  text "0.203mm" at 251.714,160.782 h1.52
  text "4.4" at 268.22,160.782 h1.52
  text "2" at 195.849,157.734 h1.52
  text "Layer 1" at 206.26,157.734 h1.52
  text "CF-004" at 229.876,157.734 h1.52
  text "0.035mm" at 251.714,157.734 h1.52
  text "Dielectric 1" at 206.26,154.686 h1.52
  text "FR-4" at 229.876,154.686 h1.52
  text "1.030mm" at 251.714,154.686 h1.52
  text "4.6" at 268.22,154.686 h1.52
  text "3" at 195.849,151.638 h1.52
  text "Layer 2" at 206.26,151.638 h1.52
  text "CF-004" at 229.876,151.638 h1.52
  text "0.035mm" at 251.714,151.638 h1.52
  text "Dielectric 3" at 206.26,148.59 h1.52
  text "PP-006" at 229.876,148.59 h1.52
  text "0.203mm" at 251.714,148.59 h1.52
  text "4.4" at 268.22,148.59 h1.52
  text "4" at 195.849,145.542 h1.52
  text "Bottom Layer" at 206.26,145.542 h1.52
  text "0.035mm" at 251.714,145.542 h1.52
  text "Bottom Solder" at 206.26,142.494 h1.52
  text "Solder Resist" at 229.876,142.494 h1.52
  text "0.010mm" at 251.714,142.494 h1.52
  text "3.5" at 268.22,142.494 h1.52
  text "Bottom Overlay" at 206.26,139.446 h1.52
  text "Total board thickness:" at 195.849,136.398 h1.52
  text "1.596mm" at 251.714,136.398 h1.52
Drill Drawing:
  lines w0.254: 1.909,150.283 3.602,150.283 2.756,148.59 1.909,150.283 ; 1.909,152.4 2.756,152.823 3.602,152.4 3.179,153.247 3.602,154.093 2.756,153.67 1.909,154.093 2.332,153.247 1.909,152.4 ; 1.909,156.633 2.332,156.633 2.756,156.21 3.179,156.633 3.602,156.633 3.179,157.057 3.602,157.48 3.179,157.48 2.756,157.903 2.332,157.48 1.909,157.48 2.332,157.057 1.909,156.633 ; 1.909,160.02 3.602,160.02 3.602,161.713 1.909,161.713 1.909,160.02 ; 1.909,163.83 3.602,163.83 3.602,165.523 1.909,165.523 1.909,163.83 ; 1.909,167.64 1.909,168.063 2.332,168.487 1.909,168.91 1.909,169.333 2.332,169.333 2.756,168.91 3.179,169.333 3.602,169.333 3.602,168.91 3.179,168.487 3.602,168.063 3.602,167.64 3.179,167.64 2.756,168.063 2.332,167.64 1.909,167.64 ; 1.909,171.873 2.332,171.873 2.332,171.45 3.179,171.45 3.179,171.873 3.602,171.873 3.602,172.72 3.179,172.72 3.179,173.143 2.332,173.143 2.332,172.72 1.909,172.72 1.909,171.873 ; 1.909,176.107 2.756,175.26 3.602,176.107 2.756,176.953 1.909,176.107 ; 2.248,164.169 3.264,164.169 3.264,165.185 2.248,165.185 2.248,164.169
  lines w0.381: 0.39,147.447 187.334,147.447 ; 0.39,177.927 187.334,177.927 ; 14.382,143.637 14.382,181.737 ; 29.618,143.637 29.618,181.737 ; 58.058,143.637 58.058,181.737 ; 70.907,143.637 70.907,181.737 ; 89.546,143.637 89.546,181.737 ; 127.635,143.637 127.635,181.737 ; 142.617,143.637 142.617,181.737 ; 161.56,143.637 161.56,181.737 ; 0.39,143.637 187.334,143.637 187.334,181.737 0.39,181.737 0.39,143.637
  text "Symbol" at 2.676,179.07 h1.83
  text "Count" at 15.525,179.07 h1.83
  text "Hole Size" at 30.761,179.07 h1.83
  text "Plated" at 59.201,179.07 h1.83
  text "Hole Type" at 72.05,179.07 h1.83
  text "Drill Layer Pair" at 90.689,179.07 h1.83
  text "Via/Pad" at 128.778,179.07 h1.83
  text "Pad Shape" at 143.76,179.07 h1.83
  text "Template" at 162.703,179.07 h1.83
  text "2" at 15.525,175.26 h1.52
  text "19.69mil (0.500mm)" at 30.761,175.26 h1.52
  text "PTH" at 59.201,175.26 h1.52
  text "Slot" at 72.05,175.26 h1.52
  text "Top Layer - Bottom Layer" at 90.689,175.26 h1.52
  text "Pad" at 128.778,175.26 h1.52
  text "Rounded" at 143.76,175.26 h1.52
  text "(Mixed)" at 162.703,175.26 h1.52
  text "2" at 15.525,171.45 h1.52
  text "23.62mil (0.600mm)" at 30.761,171.45 h1.52
  text "PTH" at 59.201,171.45 h1.52
  text "Rectangle" at 72.05,171.45 h1.52
  text "Top Layer - Bottom Layer" at 90.689,171.45 h1.52
  text "Pad" at 128.778,171.45 h1.52
  text "Rectangle" at 143.76,171.45 h1.52
  text "r120_220h60_140" at 162.703,171.45 h1.52
  text "5" at 15.525,167.64 h1.52
  text "19.69mil (0.500mm)" at 30.761,167.64 h1.52
  text "PTH" at 59.201,167.64 h1.52
  text "Round" at 72.05,167.64 h1.52
  text "Top Layer - Bottom Layer" at 90.689,167.64 h1.52
  text "Pad" at 128.778,167.64 h1.52
  text "Rounded" at 143.76,167.64 h1.52
  text "(Mixed)" at 162.703,167.64 h1.52
  text "7" at 15.525,163.83 h1.52
  text "43.31mil (1.100mm)" at 30.761,163.83 h1.52
  text "PTH" at 59.201,163.83 h1.52
  text "Round" at 72.05,163.83 h1.52
  text "Top Layer - Bottom Layer" at 90.689,163.83 h1.52
  text "Pad" at 128.778,163.83 h1.52
  text "(Mixed)" at 143.76,163.83 h1.52
  text "(Mixed)" at 162.703,163.83 h1.52
  text "8" at 15.525,160.02 h1.52
  text "35.43mil (0.900mm)" at 30.761,160.02 h1.52
  text "PTH" at 59.201,160.02 h1.52
  text "Round" at 72.05,160.02 h1.52
  text "Top Layer - Bottom Layer" at 90.689,160.02 h1.52
  text "Pad" at 128.778,160.02 h1.52
  text "(Mixed)" at 143.76,160.02 h1.52
  text "(Mixed)" at 162.703,160.02 h1.52
  text "8" at 15.525,156.21 h1.52
  text "39.37mil (1.000mm)" at 30.761,156.21 h1.52
  text "PTH" at 59.201,156.21 h1.52
  text "Round" at 72.05,156.21 h1.52
  text "Top Layer - Bottom Layer" at 90.689,156.21 h1.52
  text "Pad" at 128.778,156.21 h1.52
  text "(Mixed)" at 143.76,156.21 h1.52
  text "(Mixed)" at 162.703,156.21 h1.52
  text "8" at 15.525,152.4 h1.52
  text "118.11mil (3.000mm)" at 30.761,152.4 h1.52
  text "PTH" at 59.201,152.4 h1.52
  text "Round" at 72.05,152.4 h1.52
  text "Top Layer - Bottom Layer" at 90.689,152.4 h1.52
  text "Pad" at 128.778,152.4 h1.52
  text "Rounded" at 143.76,152.4 h1.52
  text "(Mixed)" at 162.703,152.4 h1.52
  text "552" at 15.525,148.59 h1.52
  text "11.81mil (0.300mm)" at 30.761,148.59 h1.52
  text "PTH" at 59.201,148.59 h1.52
  text "Round" at 72.05,148.59 h1.52
  text "Top Layer - Bottom Layer" at 90.689,148.59 h1.52
  text "Via" at 128.778,148.59 h1.52
  text "Rounded" at 143.76,148.59 h1.52
  text "v60h30m0mx0" at 162.703,148.59 h1.52
  text "592 Total" at 15.525,144.78 h1.52
  text "Slot definitions :" at 2.676,141.098 h1.52
  text "Routed Path Length" at 28.907,141.098 h1.52
  text "= Calculated from tool start centre position to tool end centre position." at 56.914,141.098 h1.52
  text "Hole Length" at 28.907,138.558 h1.52
  text "= Routed Path Length + Tool Size = Slot length as defined in the PCB layout" at 46.504,138.558 h1.52

## Dimensions
110,120 to 110,0 on Dimension
0,120 to 110,120 on Dimension

## Text inside footprints (layer, text, board x,y; h text height)
J4: Top Overlay "1" at 2.632,50.894 h1 r90
LS1: Top Overlay "+" at 97.242,23.309 h1 r180